# Altium PCB PCB1.PcbDoc (part 1 of 2)
Units mm, origin at the board's own origin, x right, y up, seen from the top; angles counter-clockwise.
Board outline 20 x 95 mm, 4 copper layers (Top Layer, Inner Layer 1, Inner Layer 2, Bottom Layer), stack 1.586 mm thick; 102 components, 66 nets, 399 pads, 49 vias.
Unrouted connection lines stored in the file: 134.
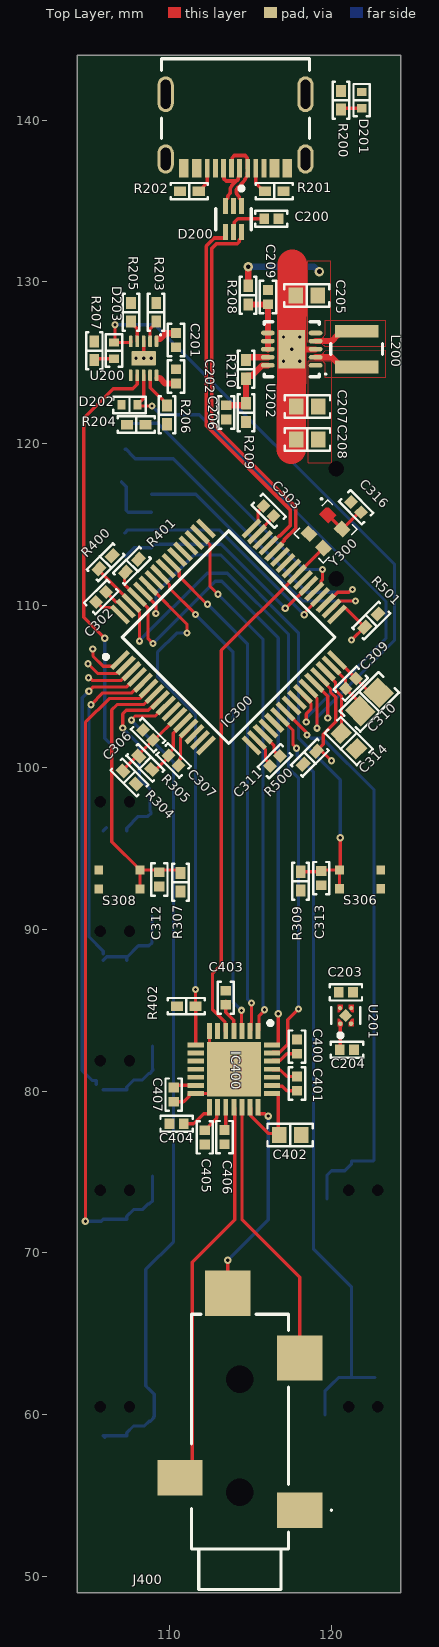
[diagram p0: Top Layer view]
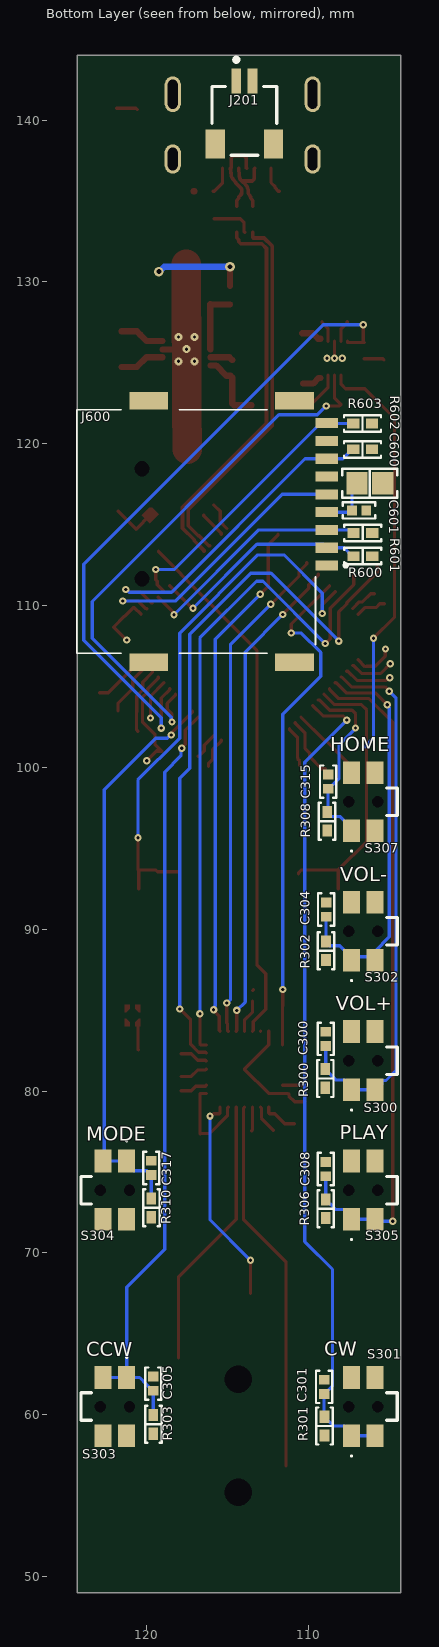
[diagram p1: Bottom Layer view, seen from below]
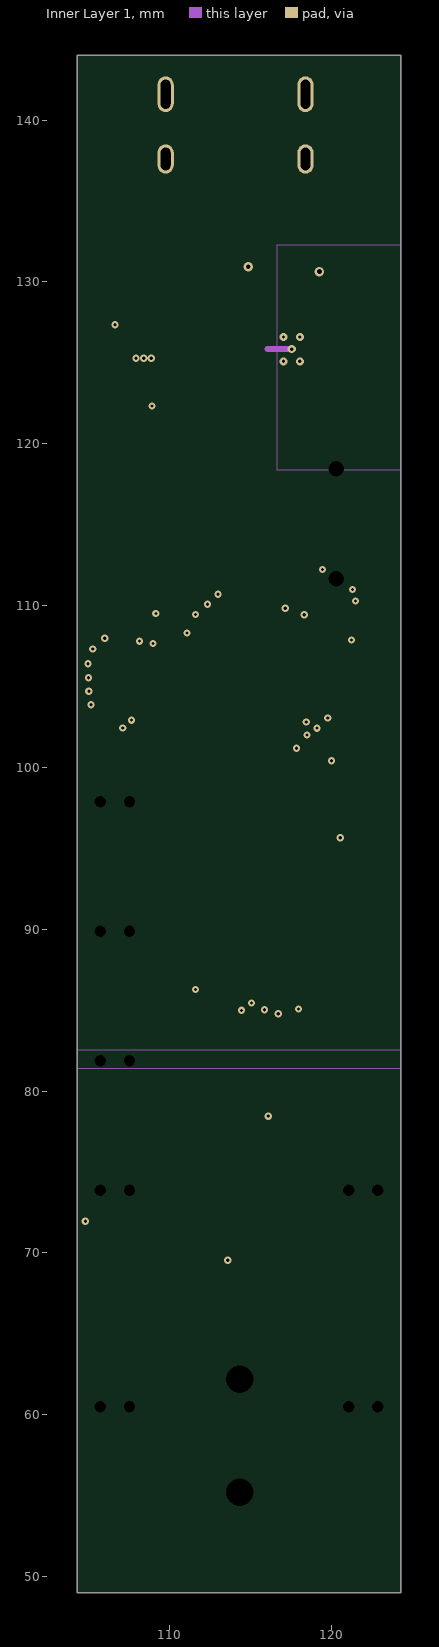
[diagram p2: Inner Layer 1]

## Layer stack, top to bottom
Top Solder: solder mask 0.0152, Solder Resist, Dk 3.8
Top Layer: signal copper 0.035
Dielectric 1: prepreg 0.2104, NP-155F, Dk 4.4
Inner Layer 1: signal copper 0.0152
Dielectric 2: core 1.065, NP-155F, Dk 4.43
Inner Layer 2: signal copper 0.0152
Dielectric 3: prepreg 0.2104, NP-155F, Dk 4.4
Bottom Layer: signal copper 0.035
Bottom Solder: solder mask 0.0152, Solder Resist, Dk 3.8

## Board outline
104.3,49 104.3,144 124.3,144 124.3,49

## Design rules (kind name [scope] priority, off if disabled: settings)
BoardOutlineClearance [All] p1: gap=0.2 ignorepadtopadclearanceinfootprint=FALSE
Clearance [All] p1: gap=0.102 ignorepadtopadclearanceinfootprint=FALSE except(0.127: Arc-Via Track-Via SMDPad-Via THPad-Via Via-Via Via-Fill Via-Poly Via-Region Via-Text; 0.25: Arc-Hole Track-Hole SMDPad-Hole THPad-Hole Via-Hole Fill-Hole Poly-Hole Region-Hole Text-Hole)
ComponentClearance [All] p1: gap=0.102 collisioncheckmode=3 verticalgap=0.102 showdistances=TRUE
DiffPairsRouting DiffPairsRoutingUSB_OUT [InDifferentialPair('USB_D')] p1: maxlimit=0.127 minlimit=0.127 mostfreqgap=0.127 toplayer_minwidth=0.224 toplayer_maxwidth=0.224 toplayer_prefwidth=0.224 midlayer1_minwidth=0.158 midlayer1_maxwidth=0.158 midlayer1_prefwidth=0.158 midlayer2_minwidth=0.158 midlayer2_maxwidth=0.158 midlayer2_prefwidth=0.158 bottomlayer_minwidth=0.225 bottomlayer_maxwidth=0.225 bottomlayer_prefwidth=0.225 impedanceprofiledriven=TRUE impedanceprofileid={13B3F718-4399-49E7-A551-6D1C1AD8C84B} impedanceprofilevalue=90.000000 maxuncoupledlength=12.7
DiffPairsRouting DiffPairsRoutingUSB_IN [InDifferentialPair('D_IN')] p2: maxlimit=0.127 minlimit=0.127 mostfreqgap=0.127 toplayer_minwidth=0.224 toplayer_maxwidth=0.224 toplayer_prefwidth=0.224 midlayer1_minwidth=0.158 midlayer1_maxwidth=0.158 midlayer1_prefwidth=0.158 midlayer2_minwidth=0.158 midlayer2_maxwidth=0.158 midlayer2_prefwidth=0.158 bottomlayer_minwidth=0.225 bottomlayer_maxwidth=0.225 bottomlayer_prefwidth=0.225 impedanceprofiledriven=TRUE impedanceprofileid={13B3F718-4399-49E7-A551-6D1C1AD8C84B} impedanceprofilevalue=90.000000 maxuncoupledlength=12.7
DiffPairsRouting [All] p3: maxlimit=0.102 minlimit=0.102 mostfreqgap=0.102 toplayer_minwidth=0.102 toplayer_maxwidth=1816.048 toplayer_prefwidth=0.102 midlayer1_minwidth=0.102 midlayer1_maxwidth=1816.048 midlayer1_prefwidth=0.102 midlayer2_minwidth=0.102 midlayer2_maxwidth=1816.048 midlayer2_prefwidth=0.102 bottomlayer_minwidth=0.102 bottomlayer_maxwidth=1816.048 bottomlayer_prefwidth=0.102 maxuncoupledlength=12.7
Height [All] p1: minheight=0 maxheight=1816.048 prefheight=12.7
HoleSize [All] p1: absolutevalues=TRUE maxlimit=6.3 minlimit=0.2 maxpercent=80.000 minpercent=20.000
HoleToHoleClearance [All] p1: gap=0.25 allowstackedmicrovias=FALSE
MinimumAnnularRing [All] p1: minimumring=0.076
MinimumSolderMaskSliver [All] p1: minsoldermaskwidth=0
PlaneClearance [All] p1: clearance=0.102
PlaneConnect PlaneConnectPowerPads [InNetClass('Power')] p1: planeconnectstyle=Direct reliefexpansion=0.508 reliefentries=4 reliefconductorwidth=0.254 reliefairgap=0.254
PlaneConnect [All] p2: pad.planeconnectstyle=Relief pad.reliefexpansion=0.3 pad.reliefentries=4 pad.reliefconductorwidth=0.102 pad.reliefairgap=0.102 via.planeconnectstyle=Direct via.reliefexpansion=0.3 via.reliefentries=4 via.reliefconductorwidth=0.127 via.reliefairgap=0.127
PolygonConnect PolygonConnectPowerPads [All vs InNetClass('Power')] p1: connectstyle=Direct reliefconductorwidth=0.254 reliefentries=4 polygonreliefangle="90 Angle" airgapwidth=0.254
PolygonConnect PolygonConnectGNDPads [All vs InNetClass('GND')] p2: connectstyle=Direct reliefconductorwidth=0.254 reliefentries=4 polygonreliefangle="90 Angle" airgapwidth=0.254
PolygonConnect [All] p3: thpad.connectstyle=Relief thpad.reliefconductorwidth=0.102 thpad.reliefentries=4 thpad.polygonreliefangle="90 Angle" thpad.airgapwidth=0.102 smdpad.connectstyle=Relief smdpad.reliefconductorwidth=0.102 smdpad.reliefentries=4 smdpad.polygonreliefangle="90 Angle" smdpad.airgapwidth=0.102 via.connectstyle=Direct via.reliefconductorwidth=0.127 via.reliefentries=4 via.polygonreliefangle="90 Angle" via.airgapwidth=0.127
RoutingVias [All] p1: holewidth=0.2 width=0.45 viastyle="Through Hole" minholewidth=0.2 minwidth=0.45 maxholewidth=6.3 maxwidth=6.55
ShortCircuit ShortCircuitGND [InNetClass('GND') vs InNetClass('GND')] p1: allowed=TRUE
ShortCircuit [All] p2: allowed=FALSE
SilkToSilkClearance [All] p1: silktosilkclearance=0
SilkToSolderMaskClearance [IsPad] p1: minsilkscreentomaskgap=0.102 clearancetoexposedcopper=TRUE
SolderMaskExpansion [All] p1: expansion=0.075 istentingtop=FALSE
SupplyNets "Schematic Supply Nets_7" [InNet('VBUS')] p1: voltage=0.000
SupplyNets "Schematic Supply Nets_6" [InNet('DGND')] p2: voltage=0.000
SupplyNets "Schematic Supply Nets_5" [InNet('PGND')] p3: voltage=0.000
SupplyNets "Schematic Supply Nets_4" [InNet('AGND')] p4: voltage=0.000
SupplyNets "Schematic Supply Nets_3" [InNet('AVDD_3V')] p5: voltage=0.000
SupplyNets "Schematic Supply Nets_2" [InNet('VBAT')] p6: voltage=0.000
SupplyNets "Schematic Supply Nets" [InNet('DVDD_3V3')] p7: voltage=0.000
Width [All] p1: maxlimit=1816.048 minlimit=0.102 preferedwidth=0.102
19 further rules are at their usual default settings.

## Classes and differential pairs
net class GND: AGND DGND PGND
net class Power: AVDD_3V DVDD_3V3 NetL200_1 NetL200_2 VBAT VBUS
component class Power: C200 C201 C202 C203 C204 C205 C206 C207 C208 C209 D200 D201 D202 D203 J201 L200 NT200 R200 R201 R202 R203 R204 R205 R206 R207 R208 R209 R210 U200 U201 U202
component class Memory: C600 C601 J600 R600 R601 R602 R603
component class MCU: C300 C301 C302 C303 C304 C305 C306 C307 C308 C309 C310 C311 C312 C313 C314 C315 C316 C317 IC300 R300 R301 R302 R303 R304 R305 R306 R307 R308 R309 R310 S300 S301 S302 S303 S304 S305 S306 S307 S308 Y300
component class Display: C500 C501 C502 C503 C504 C505 J500 R500 R501 R502
component class Audio: C400 C401 C402 C403 C404 C405 C406 C407 IC400 J400 NT400 R400 R401 R402
differential pair USB_D: +USB_D_P -USB_D_N
differential pair D_IN: +D_IN_P -D_IN_N

## Components (designator, comment, footprint, x,y, rotation, side; value= is the part's Value field where it differs from the comment)
C200 "0.1 µF" "CAP 0402_1005" 116.287,133.902 r0 top
C201 "1 µF" "CAP 0402_1005" 110.4,126.4 r90 top
C202 "1 µF" "CAP 0402_1005" 110.4,124.16 r270 top
C203 "1 µF" "CAP 0402_1005" 120.892,86.096 r180 top
C204 "1 µF" "CAP 0402_1005" 120.96,82.55 r180 top
C205 "10 µF" "CAP 0603_1608" 118.477,129.15 r0 top
C206 "2.2 pF" "CAP 0402_1005" 113.508,121.932 r90 top
C207 "10 µF" "CAP 0603_1608" 118.517,122.292 r0 top
C208 "10 µF" "CAP 0603_1608" 118.517,120.26 r0 top
C209 "0.1 µF" "CAP 0402_1005" 116.085,129.055 r270 top
C300 "0.1 µF" "CAP 0402_1005" 108.95,83.225 r90 bottom
C301 "0.1 µF" "CAP 0402_1005" 109.05,61.725 r90 bottom
C302 "0.1 µF" "CAP 0402_1005" 105.775,110.525 r225 top
C303 "0.1 µF" "CAP 0402_1005" 116.125,115.85 r315 top
C304 "0.1 µF" "CAP 0402_1005" 108.925,91.215 r90 bottom
C305 "0.1 µF" "CAP 0402_1005" 119.6,61.915 r90 bottom
C306 "0.1 µF" "CAP 0402_1005" 108.675,102 r315 top
C307 "0.1 µF" "CAP 0402_1005" 110.25,100.425 r135 top
C308 "0.1 µF" "CAP 0402_1005" 108.95,75.175 r90 bottom
C309 "0.1 µF" "CAP 0402_1005" 121.2,105.175 r225 top
C310 "4.7 µF" "CAP 0805_2012" 122.35,104.05 r45 top
C311 "0.1 µF" "CAP 0402_1005" 116.51,100.382 r45 top
C312 "0.1 µF" "CAP 0402_1005" 109.375,93.075 r270 top
C313 "0.1 µF" "CAP 0402_1005" 119.375,93.15 r270 top
C314 "2.2 µF" "CAP 0603_1608" 121.075,101.625 r135 top
C315 "0.1 µF" "CAP 0402_1005" 108.8,99.115 r90 bottom
C316 "0.1 µF" "CAP 0402_1005" 121.525,116.075 r135 top
C317 "0.1 µF" "CAP 0402_1005" 119.725,75.25 r90 bottom
C400 "1 µF" "CAP 0402_1005" 117.875,82.74 r90 top
C401 "0.47 µF" "CAP 0402_1005" 117.875,80.46 r270 top
C402 "2.2 µF" "CAP 0603_1608" 117.456,77.284 r0 top
C403 "1 µF" "CAP 0402_1005" 113.475,85.765 r90 top
C404 "1 µF" "CAP 0402_1005" 110.44,77.975 r180 top
C405 "1 µF" "CAP 0402_1005" 112.175,77.14 r270 top
C406 "1 µF" "CAP 0402_1005" 113.4,77.15 r270 top
C407 "1 µF" "CAP 0402_1005" 110.25,79.775 r270 top
C500 "1 µF" "CAP 0603_1608" 139.625,68.25 r90 bottom
C501 "1 µF" "CAP 0603_1608" 134.5,68.275 r90 bottom
C502 "1 µF" "CAP 0603_1608" 137.9,68.25 r270 bottom
C503 "1 µF" "CAP 0603_1608" 136.175,68.25 r90 bottom
C504 "4.7 µF" "CAP 0805_2012" 131.3,68.575 r270 bottom
C505 "2.2 µF" "CAP 0603_1608" 129.4,68.3 r90 bottom
C600 "4.7 µF" "CAP 0805_2012" 106.225,117.55 r0 bottom
C601 "0.1 µF" "CAP 0402_1005" 106.89,115.875 r180 bottom
D200 "USBLC6-2P6" FP-SOT-666-MFG 113.952,133.872 r270 top
D201 "Green" "LED QTB IPC 0402_1005 GREEN" 121.875,141.225 r270 top
D202 "Blue" "LED QTB IPC 0402_1005 BLUE" 107.525,122.4 r180 top
D203 "Red" "LED QTB IPC 0402_1005 RED" 106.575,125.75 r270 top
IC300 "STM32C552RET6" QFP50P1200X1200X160-64N 113.65,108.05 r45 top locked
IC400 "MAX9850ETI+T" QFN50P500X500X80-29N 113.975,81.35 r270 top
J201 "SM02B-SRSS-TB (LF)(SN)" FP-SM02B-SRSS-TB_LF_SN-MFG 113.975,139.95 r180 bottom
J400 "SJ-3524-SMT-TR-BE" SJ3524SMTTRBE 114.35,58.95 r90 top locked
J500 "FPC-CON0.62-14P" FPC-CON0.62-14P 138.395,64.1 r90 bottom
J600 "MEM2075-00-140-01-A" MEM20750014001A 116.255,114.575 r270 bottom
L200 "1.5 uH" FP-LQH3NPN_JR-MFG 121.565,125.848 r270 top
NT200 "NET_TIE" NET_TIE 148.65,140.544 r180 top net-tie
NT400 "NET_TIE" NET_TIE 148.25,135 r180 top net-tie
R200 "1.5 kOhms" "RES 0402_1005" 120.6,141.225 r270 top
R201 "5.1 kOhms" "RES 0402_1005" 116.477,135.602 r180 top
R202 "5.1 kOhms" "RES 0402_1005" 111.227,135.602 r0 top
R203 "1.54 kOhms" "RES 0402_1005" 109.175,128.125 r270 top
R204 "1.5 kOhms" "RES 0402_1005" 107.95,121.175 r180 top
R205 "2 kOhms" "RES 0402_1005" 107.625,128.125 r270 top
R206 "10 kOhms" "RES 0402_1005" 109.85,121.775 r90 top
R207 "1.5 kOhms" "RES 0402_1005" 105.35,125.75 r270 top
R208 "100 Ohms" "RES 0402_1005" 114.86,129.18 r90 top
R209 "1 MOhms" "RES 0402_1005" 114.724,121.924 r270 top
R210 "178 kOhms" "RES 0402_1005" 114.724,124.591 r270 top
R300 "10 kOhms" "RES 0402_1005" 108.975,80.775 r270 bottom
R301 "10 kOhms" "RES 0402_1005" 109.025,59.3 r270 bottom
R302 "10 kOhms" "RES 0402_1005" 108.925,88.675 r270 bottom
R303 "10 kOhms" "RES 0402_1005" 119.6,59.4 r270 bottom
R304 "100 kOhms" "RES 0402_1005" 107.525,99.375 r315 top
R305 "100 kOhms" "RES 0402_1005" 108.5,100.275 r135 top
R306 "10 kOhms" "RES 0402_1005" 108.95,72.725 r270 bottom
R307 "10 kOhms" "RES 0402_1005" 110.675,92.9 r270 top
R308 "10 kOhms" "RES 0402_1005" 108.858,96.669 r270 bottom
R309 "10 kOhms" "RES 0402_1005" 118.1,92.975 r90 top
R310 "10 kOhms" "RES 0402_1005" 119.725,72.775 r270 bottom
R400 "10 kOhms" "RES 0402_1005" 106.05,112.675 r225 top
R401 "10 kOhms" "RES 0402_1005" 107.682,112.457 r45 top
R402 "10 kOhms" "RES 0402_1005" 111.038,85.241 r180 top
R500 "10 kOhms" "RES 0402_1005" 118.668,100.593 r45 top
R501 "10 kOhms" "RES 0402_1005" 122.468,109.068 r225 top
R502 "390 kOhms" "RES 0402_1005" 133.025,68.05 r270 bottom
R600 "10 kOhms" "RES 0402_1005" 106.65,113.05 r180 bottom
R601 "10 kOhms" "RES 0402_1005" 106.65,114.475 r180 bottom
R602 "10 kOhms" "RES 0402_1005" 106.675,119.65 r180 bottom
R603 "100 kOhms" "RES 0402_1005" 106.675,121.25 r180 bottom
S300 "EVQP7L01P" EVQP7L01P 106.3,81.875 r90 bottom
S301 "EVQP7L01P" EVQP7L01P 106.3,60.5 r90 bottom
S302 "EVQP7L01P" EVQP7L01P 106.3,89.875 r90 bottom locked
S303 "EVQP7L01P" EVQP7L01P 122.3,60.5 r270 bottom locked
S304 "EVQP7L01P" EVQP7L01P 122.3,73.875 r270 bottom locked
S305 "EVQP7L01P" EVQP7L01P 106.3,73.875 r90 bottom
S306 "SKSVCBE010" SKSVCBE010 121.775,93.075 r0 top
S307 "EVQP7L01P" EVQP7L01P 106.3,97.875 r90 bottom
S308 "SKSVCBE010" SKSVCBE010 106.9,93.07 r0 top
U200 "BQ24040DSQR" DSQ0010A_V 108.4,125.275 r270 top
U201 "TPS7A2030PDQNR" DQN0004A-MFG 120.885,84.665 r90 top
U202 "TPS63000DRCRG4" DRC10-2400X1650TP 117.55,125.84 r180 top
Y300 "DSC6001JI2B-022.5792T" 4-VLGA-2.5X2 120.667,114.717 r225 top

## Footprints (in the part's own frame and the unit in brackets; to place one, negate y for a bottom-side part, rotate by r counter-clockwise, add the part's x,y. Pads: shape width x height; smd on the part's side, far side on the other; paste and mask are expansions set on the pad)
4-VLGA-2.5X2 [mm]
  round 0.025 smd: 1(0,-1.25)
  rect 0.7x0.8 smd: 2(1.65,-1.25) 3(1.65,0) 4(0,0)
  silkscreen extent -0.65,-2.24 2.3,0.65
"CAP 0402_1005" [mm] "Chip Capacitor, 2-Leads, Body 1.02x0.51mm, IPC Medium Density"
  rect 0.6x0.64 smd: 1(-0.44,0) 2(0.44,0)
  silkscreen extent -1,-0.5 1,0.5, body extent -0.5,-0.26 0.5,0.26, height 0.52
"CAP 0603_1608" [mm] "Chip Capacitor, 2-Leads, Body 1.60x0.80mm, IPC Medium Density"
  rect 0.9x1 smd: 1(-0.675,0) 2(0.675,0)
  silkscreen extent -1.4,-0.7 1.4,0.7, body extent -0.8,-0.41 0.8,0.41, height 0.82
"CAP 0805_2012" [mm] "Chip Capacitor, 2-Leads, Body 2.00x1.20mm, IPC Medium Density"
  rect 1.3x1.4 smd: 1(-0.8,0) 2(0.8,0)
  silkscreen extent -1.7,-0.9 1.7,0.9, body extent -1,-0.64 1,0.64, height 1.26
DQN0004A-MFG [mm]
  round 0.279 smd paste-0.127 mask-0.127: 1(-0.505,0.33) 2(-0.505,-0.33)
  round 0.251 smd paste-0.113 mask-0.114: 3(0.459,-0.346) 4(0.459,0.346)
  rect 0.58x0.58 smd rot 135 paste-0.277 mask-0.279: 5(0,0)
  Top Layer region: 0.66,-0.175 0.66,-0.485 0.2,-0.485 0.2,-0.385 0.41,-0.175
  Top Layer region: 0.66,0.175 0.66,0.485 0.2,0.485 0.2,0.385 0.41,0.175
  Top Layer region: -0.66,-0.175 -0.66,-0.485 -0.2,-0.485 -0.2,-0.385 -0.41,-0.175
  Top Layer region: -0.66,0.175 -0.66,0.485 -0.2,0.485 -0.2,0.385 -0.41,0.175
  silkscreen extent -1.35,-0.9 0.53,0.9, body extent -0.5,-0.5 0.5,0.5, height 0.34
DRC10-2400X1650TP [mm] "SON, 10-Leads, Body 3x3mm, Pitch 0.5mm, Thermal Pad 2.4x1.65mm, TI Recommended"
  oval 0.85x0.28 smd paste-0.025 mask+0.07: 1(-1.475,1) 2(-1.475,0.5) 3(-1.475,0) 4(-1.475,-0.5) 5(-1.475,-1) 6(1.475,-1) 7(1.475,-0.5) 8(1.475,0) 9(1.475,0.5) 10(1.475,1)
  rect 1.65x2.4 smd paste-0.825 mask+0.07: 11(0,0)
  Top Layer region: -0.39,-1.9 -0.11,-1.9 -0.11,-1.2 -0.39,-1.2
  Top Layer region: 0.39,-1.2 0.11,-1.2 0.11,-1.9 0.39,-1.9
  Top Layer region: 0.39,1.9 0.11,1.9 0.11,1.2 0.39,1.2
  Top Layer region: -0.39,1.2 -0.11,1.2 -0.11,1.9 -0.39,1.9
  silkscreen extent -2.15,-1.7 1.7,1.7, body extent -1.55,-1.55 1.55,1.55, height 1
DSQ0010A_V [mm] "SON, 10-Leads, Body 2x2mm, Pitch 0.4mm, Thermal Pad 1.5x0.9mm"
  rrect43% 0.7x0.23 smd: 1(-1.05,0.8) 2(-1.05,0.4) 3(-1.05,0) 4(-1.05,-0.4) 5(-1.05,-0.8) 6(1.05,-0.8) 7(1.05,-0.4) 8(1.05,0) 9(1.05,0.4) 10(1.05,0.8)
  rrect11% 0.9x1.5 smd: 11(0,0)
  silkscreen extent -1.5,1 -1.4,1.1, body extent -1,-1 1,1, height 0.8
EVQP7L01P [mm]
  rect 1.4x1.05 smd: 1(-1.8,1.05) 2(1.8,1.05) 3(-1.8,-0.4) 4(1.8,-0.4)
  round 0.35 hole 0.7 unplated: 5(0,1.225) 6(0,-0.575)
  silkscreen extent -3.1,-1.78 0.85,1.1, body extent -2.35,-1.78 2.35,1.77, height 1.35
FP-LQH3NPN_JR-MFG [mm]
  rect 0.8x2.7 smd paste+0 mask+0: 1(-1.1,0) 2(1.1,0)
  silkscreen extent -0.33,-1.6 0.33,1.6, body extent -1.7,-1.7 1.7,1.7, height 0.25
FP-SM02B-SRSS-TB_LF_SN-MFG [mm]
  rect 0.6x1.55 smd paste+0 mask+0: 1(-0.5,2.45) 2(0.5,2.45)
  rect 1.2x1.8 smd paste+0 mask+0: 3(-1.8,-1.425) 4(1.8,-1.425)
  silkscreen extent -2,-2.12 2,3.9, body extent -2,-2.12 2,2.83, height 2.96
FP-SOT-666-MFG [mm]
  rect 0.99x0.3 smd paste+0 mask+0: 1(-0.805,0.5) 2(-0.805,0) 3(-0.805,-0.5) 4(0.805,-0.5) 5(0.805,0) 6(0.805,0.5)
  silkscreen extent -2.02,-1.1 0.65,1.1, body extent -1.4,-0.95 1.4,0.95, height 0.25
FPC-CON0.62-14P [mm] "FPC Connector 14 Pin 0.62mm Pitch"
  rect 2.5x0.32 smd: 1(0.25,0) 2(0.25,-0.62) 3(0.25,-1.24) 4(0.25,-1.86) 5(0.25,-2.48) 6(0.25,-3.1) 7(0.25,-3.72) 8(0.25,-4.34) 9(0.25,-4.96) 10(0.25,-5.58) 11(0.25,-6.2) 12(0.25,-6.82) 13(0.25,-7.44) 14(0.25,-8.06)
  silkscreen extent -5.4,-8.65 1.04,0.6
"LED QTB IPC 0402_1005 BLUE" [mm] "QT BrightekChip Diode, 2-Leads, Body 1.00x0.50mm"
  rect 0.5x0.6 smd: A(0.5,0) C(-0.5,0)
  silkscreen extent -1,-0.51 1,0.51, body extent -0.5,-0.25 0.5,0.25, height 0.21
"LED QTB IPC 0402_1005 GREEN" [mm] "QT BrightekChip Diode, 2-Leads, Body 1.00x0.50mm"
  rect 0.5x0.6 smd: A(0.5,0) C(-0.5,0)
  silkscreen extent -1,-0.51 1,0.51, body extent -0.5,-0.25 0.5,0.25, height 0.21
"LED QTB IPC 0402_1005 RED" [mm] "QT BrightekChip Diode, 2-Leads, Body 1.00x0.50mm"
  rect 0.5x0.6 smd: A(0.5,0) C(-0.5,0)
  silkscreen extent -1,-0.51 1,0.51, body extent -0.5,-0.25 0.5,0.25, height 0.21
MEM20750014001A [mm]
  rect 0.62x1.4 smd: 1(2.105,7.375) 2(1.005,7.375) 3(-0.095,7.375) 4(-1.195,7.375) 5(-2.295,7.375) 6(-3.395,7.375) 7(-4.495,7.375) 8(-5.595,7.375) 9(-6.695,7.375)
  rect 1.1x2.4 smd: 10(-8.075,5.375) 11(-8.075,-3.625) 12(8.075,-3.625) 13(8.075,5.375)
  round 0.475 hole 0.95 unplated: 14(-3.875,-4.045) 15(2.925,-4.045)
  silkscreen extent -7.52,-8.08 7.52,8.65, body extent -8.23,-8.24 8.22,7.61, height 1.39
NET_TIE [mil] "Net Tie"
  rect 60x60 smd: 1(0,-0.98) 2(125.98,-0.98)
  Top Layer region: 15.75,-30.99 112.6,-30.99 112.6,29.01 15.75,29.01
QFN50P500X500X80-29N [mm]
  rect 1x0.3 smd: 1(-2.35,1.5) 2(-2.35,1) 3(-2.35,0.5) 4(-2.35,0) 5(-2.35,-0.5) 6(-2.35,-1) 7(-2.35,-1.5) 15(2.35,-1.5) 16(2.35,-1) 17(2.35,-0.5) 18(2.35,0) 19(2.35,0.5) 20(2.35,1) 21(2.35,1.5)
  rect 0.3x1 smd: 8(-1.5,-2.35) 9(-1,-2.35) 10(-0.5,-2.35) 11(0,-2.35) 12(0.5,-2.35) 13(1,-2.35) 14(1.5,-2.35) 22(1.5,2.35) 23(1,2.35) 24(0.5,2.35) 25(0,2.35) 26(-0.5,2.35) 27(-1,2.35) 28(-1.5,2.35)
  rect 3.35x3.35 smd: 29(0,0)
  silkscreen extent -2.97,2.13 -2.73,2.38, body extent -2.55,-2.55 2.55,2.55, height 0.8
QFP50P1200X1200X160-64N [mm]
  rect 1.475x0.3 smd: 1(-5.738,3.75) 2(-5.738,3.25) 3(-5.738,2.75) 4(-5.738,2.25) 5(-5.738,1.75) 6(-5.738,1.25) 7(-5.738,0.75) 8(-5.738,0.25) 9(-5.738,-0.25) 10(-5.738,-0.75) 11(-5.738,-1.25) 12(-5.738,-1.75) 13(-5.738,-2.25) 14(-5.738,-2.75) 15(-5.738,-3.25) 16(-5.738,-3.75) 33(5.738,-3.75) 34(5.738,-3.25) 35(5.738,-2.75) 36(5.738,-2.25) 37(5.738,-1.75) 38(5.738,-1.25) 39(5.738,-0.75) 40(5.738,-0.25) 41(5.738,0.25) 42(5.738,0.75) 43(5.738,1.25) 44(5.738,1.75) 45(5.738,2.25) 46(5.738,2.75) 47(5.738,3.25) 48(5.738,3.75)
  rect 0.3x1.475 smd: 17(-3.75,-5.738) 18(-3.25,-5.738) 19(-2.75,-5.738) 20(-2.25,-5.738) 21(-1.75,-5.738) 22(-1.25,-5.738) 23(-0.75,-5.738) 24(-0.25,-5.738) 25(0.25,-5.738) 26(0.75,-5.738) 27(1.25,-5.738) 28(1.75,-5.738) 29(2.25,-5.738) 30(2.75,-5.738) 31(3.25,-5.738) 32(3.75,-5.738) 49(3.75,5.738) 50(3.25,5.738) 51(2.75,5.738) 52(2.25,5.738) 53(1.75,5.738) 54(1.25,5.738) 55(0.75,5.738) 56(0.25,5.738) 57(-0.25,5.738) 58(-0.75,5.738) 59(-1.25,5.738) 60(-1.75,5.738) 61(-2.25,5.738) 62(-2.75,5.738) 63(-3.25,5.738) 64(-3.75,5.738)
  silkscreen extent -6.35,-4.65 4.65,4.65, body extent -6.01,-6.01 6.01,6.01, height 1.61
"RES 0402_1005" [mm] "Chip Resistor, 2-Leads, Body 1.0x0.5mm, IPC Medium Density"
  rect 0.75x0.6 smd: 1(-0.575,0) 2(0.575,0)
  silkscreen extent -1.14,-0.51 1.14,0.51, body extent -0.5,-0.25 0.5,0.25, height 0.35
SJ3524SMTTRBE [mm]
  rect 2.2x2.8 smd: 1(-4.85,-3.7) 3(-2.85,3.7)
  rect 2.8x2.8 smd: 2(4.55,-3.7) 4(8.55,0.75)
  round 0.85 hole 1.7 unplated: MH1(-3.75,0) MH2(3.25,0)
  silkscreen extent -9.75,-5.7 7.25,3, body extent -9.75,-4.5 9.25,4.5, height 5.1
SKSVCBE010 [mm]
  rect 0.55x0.57 smd: 1(-1.275,0.58) 2(-1.275,-0.58) 3(1.275,0.58) 4(1.275,-0.58)
  body extent -1.5,-0.95 1.5,0.95, height 0.51

## Part data
C200 C209 C300 C301 C302 C303 C304 C305 C306 C307 C308 C309 C311 C312 C313 C315 C316 C317 C601: library part EMF105B7104KVHF, "CAP CER 0.1UF 16V X7R 0402", Device Package="0402 (1005 Metric)", manufacturer="Taiyo Yuden", Operating Temperature="-55°C ~ 125°C", Ratings=AEC-Q200, Supplier Part Number 1=587-6563-1-ND, Temperature Coefficient=X7R, Tolerance=±10%, Voltage - Rated=16V, Applications="Automotive, SMPS Filtering", Capacitance="0.1 µF", componentlink1description=Datasheet, componentlink1url=https://ds.yuden.co.jp/TYCOMPAS/ut/detail?pn=EMF105B7104KVHF&u=M, componentlink2description="DigiKey Link", componentlink2url=https://www.digikey.com/en/products/detail/taiyo-yuden/EMF105B7104KVHF/10379129, lastupdated="4/6/2026 7:11:11 PM", Lifecycle Status=Active, Minimum Order=1, Mounting Type="Surface Mount, MLCC", Package / Case="0402 (1005 Metric)", packaging=TapeAndReel, Part Number=EMF105B7104KVHF, Part Status=Active, partid=1868, price=0.01, series=M, Size / Dimension="0.039\" L x 0.020\" W (1.00mm x 0.50mm)", Supplier 1=DigiKey, Thickness (Max)="0.022\" (0.55mm)"
C201 C202 C203 C204 C400 C403 C404 C405 C406 C407: library part GRM155R61C105MA12D, "CAP CER 1UF 16V X5R 0402", Device Package="0402 (1005 Metric)", manufacturer="Murata Electronics", Operating Temperature="-55°C ~ 85°C", Supplier Part Number 1=490-14599-1-ND, Temperature Coefficient=X5R, Tolerance=±20%, Voltage - Rated=16V, Applications="General Purpose", Capacitance="1 µF", componentlink1description=Datasheet, componentlink1url=https://search.murata.co.jp/Ceramy/image/img/A01X/G101/ENG/GRM155R61C105MA12-01.pdf, componentlink2description="DigiKey Link", componentlink2url=https://www.digikey.com/en/products/detail/murata-electronics/GRM155R61C105MA12D/4905131, lastupdated="4/6/2026 7:10:35 PM", Lifecycle Status=Active, Minimum Order=1, Mounting Type="Surface Mount, MLCC", Package / Case="0402 (1005 Metric)", packaging=TapeAndReel, Part Number=GRM155R61C105MA12D, Part Status=Active, partid=10295, price=0.01, series=GRM, Size / Dimension="0.039\" L x 0.020\" W (1.00mm x 0.50mm)", Supplier 1=DigiKey, Thickness (Max)="0.022\" (0.55mm)"
C205 C207 C208: library part GRM188R61A106ME69D, "CAP CER 10UF 10V X5R 0603", Device Package="0603 (1608 Metric)", manufacturer="Murata Electronics", Operating Temperature="-55°C ~ 85°C", Supplier Part Number 1=490-10475-1-ND, Temperature Coefficient=X5R, Tolerance=±20%, Voltage - Rated=10V, Applications="General Purpose", Capacitance="10 µF", componentlink1description=Datasheet, componentlink1url=https://search.murata.co.jp/Ceramy/image/img/A01X/G101/ENG/GRM188R61A106ME69-01.pdf, componentlink2description="DigiKey Link", componentlink2url=https://www.digikey.com/en/products/detail/murata-electronics/GRM188R61A106ME69D/5027560, lastupdated="4/6/2026 7:23:20 PM", Lifecycle Status=Active, Minimum Order=1, Mounting Type="Surface Mount, MLCC", Package / Case="0603 (1608 Metric)", packaging=TapeAndReel, Part Number=GRM188R61A106ME69D, Part Status=Active, partid=11157, price=0.01, series=GRM, Size / Dimension="0.063\" L x 0.031\" W (1.60mm x 0.80mm)", Supplier 1=DigiKey, Thickness (Max)="0.037\" (0.95mm)"
C206: library part UMK105CG2R2CV-F, "CAP CER 2.2PF 50V C0G/NP0 0402", Device Package="0402 (1005 Metric)", manufacturer="Taiyo Yuden", Operating Temperature="-55°C ~ 125°C", Supplier Part Number 1=587-3179-1-ND, Temperature Coefficient="C0G, NP0", Tolerance=±0.25pF, Voltage - Rated=50V, Applications="General Purpose", Capacitance="2.2 pF", componentlink2description="DigiKey Link", componentlink2url=https://www.digikey.com/en/products/detail/taiyo-yuden/UMK105CG2R2CV-F/3194992, lastupdated="06/04/2026 19:11:11", Lifecycle Status=Active, Minimum Order=1, Mounting Type="Surface Mount, MLCC", Package / Case="0402 (1005 Metric)", packaging=TapeAndReel, Part Number=UMK105CG2R2CV-F, Part Status=Active, partid=1907, price=0.01, series=M, Size / Dimension="0.039\" L x 0.020\" W (1.00mm x 0.50mm)", Supplier 1=DigiKey, Thickness (Max)="0.022\" (0.55mm)"
C310 C504 C600: library part MSAST21GAB5475KTNA01, "CAP CER 4.7UF 25V X5R 0805", Device Package="0805 (2012 Metric)", manufacturer="Taiyo Yuden", Operating Temperature="-55°C ~ 85°C", Supplier Part Number 1=587-MSAST21GAB5475KTNA01CT-ND, Temperature Coefficient=X5R, Tolerance=±10%, Voltage - Rated=25V, Applications="SMPS Filtering", Capacitance="4.7 µF", componentlink1description=Datasheet, componentlink1url=https://mm.digikey.com/Volume0/opasdata/d220001/medias/docus/5731/MSR01_e.pdf, componentlink2description="DigiKey Link", componentlink2url=https://www.digikey.com/en/products/detail/taiyo-yuden/MSAST21GAB5475KTNA01/16659772, lastupdated="4/6/2026 7:29:35 PM", Lifecycle Status=Active, Minimum Order=1, Mounting Type="Surface Mount, MLCC", Package / Case="0805 (2012 Metric)", packaging=TapeAndReel, Part Number=MSAST21GAB5475KTNA01, partid=73602, price=0.02, series=MSAS, Size / Dimension="0.079\" L x 0.049\" W (2.00mm x 1.25mm)", Supplier 1=DigiKey, Thickness (Max)="0.055\" (1.40mm)"
C314 C402 C505: library part GRM188R61E225KA12D, "CAP CER 2.2UF 25V X5R 0603", Device Package="0603 (1608 Metric)", manufacturer="Murata Electronics", Operating Temperature="-55°C ~ 85°C", Supplier Part Number 1=490-10731-1-ND, Temperature Coefficient=X5R, Tolerance=±10%, Voltage - Rated=25V, Applications="General Purpose", Capacitance="2.2 µF", componentlink1description=Datasheet, componentlink1url=https://search.murata.co.jp/Ceramy/image/img/A01X/G101/ENG/GRM188R61E225KA12-01.pdf, componentlink2description="DigiKey Link", componentlink2url=https://www.digikey.com/en/products/detail/murata-electronics/GRM188R61E225KA12D/4905349, lastupdated="4/6/2026 7:23:52 PM", Lifecycle Status=Active, Minimum Order=1, Mounting Type="Surface Mount, MLCC", Package / Case="0603 (1608 Metric)", packaging=TapeAndReel, Part Number=GRM188R61E225KA12D, Part Status=Active, partid=2326, price=0.01, series=GRM, Size / Dimension="0.063\" L x 0.031\" W (1.60mm x 0.80mm)", Supplier 1=DigiKey, Thickness (Max)="0.035\" (0.90mm)"
C401: library part CL05A474KP5NNNC, "CAP CER 0.47UF 10V X5R 0402", Device Package="0402 (1005 Metric)", manufacturer="Samsung Electro-Mechanics", Operating Temperature="-55°C ~ 85°C", Supplier Part Number 1=1276-1173-1-ND, Temperature Coefficient=X5R, Tolerance=±10%, Voltage - Rated=10V, Applications="General Purpose", Capacitance="0.47 µF", componentlink1description=Datasheet, componentlink1url=http://www.samsungsem.com/kr/support/product-search/mlcc/CL05A474KP5NNNC.jsp, componentlink2description="DigiKey Link", componentlink2url=https://www.digikey.com/en/products/detail/samsung-electro-mechanics/CL05A474KP5NNNC/3886831, lastupdated="4/6/2026 7:11:04 PM", Lifecycle Status=Active, Minimum Order=1, Mounting Type="Surface Mount, MLCC", Package / Case="0402 (1005 Metric)", packaging=TapeAndReel, Part Number=CL05A474KP5NNNC, Part Status=Active, partid=3144, price=0.01, series=CL, Size / Dimension="0.039\" L x 0.020\" W (1.00mm x 0.50mm)", Supplier 1=DigiKey, Thickness (Max)="0.022\" (0.55mm)"
C500 C501 C502 C503: library part CL10A105KA8NFNC, "CAP CER 1UF 25V X5R 0603", Device Package="0603 (1608 Metric)", manufacturer="Samsung Electro-Mechanics", Operating Temperature="-55°C ~ 85°C", Supplier Part Number 1=1276-1859-1-ND, Temperature Coefficient=X5R, Tolerance=±10%, Voltage - Rated=25V, Applications="General Purpose", Capacitance="1 µF", componentlink1description=Datasheet, componentlink1url=http://www.samsungsem.com/kr/support/product-search/mlcc/CL10A105KA8NFNC.jsp, componentlink2description="DigiKey Link", componentlink2url=https://www.digikey.com/en/products/detail/samsung-electro-mechanics/CL10A105KA8NFNC/3887517, lastupdated="4/6/2026 7:23:08 PM", Lifecycle Status=Active, Minimum Order=1, Mounting Type="Surface Mount, MLCC", Package / Case="0603 (1608 Metric)", packaging=TapeAndReel, Part Number=CL10A105KA8NFNC, Part Status=Active, partid=14268, price=0.01, series=CL, Size / Dimension="0.063\" L x 0.031\" W (1.60mm x 0.80mm)", Supplier 1=DigiKey, Thickness (Max)="0.035\" (0.90mm)"
D200: library part CMP-12225-000058-1, "TVS DIODE 5.25V 17V SOT666", Breakdown Voltage=6V, Capacitance=3.5pF, Case/Package=SOT-666, Clamping Voltage=17V, Leakage Current=150nA, Max Operating Temperature=125°C, Min Operating Temperature=-40°C, Operating Supply Voltage=5V, Package Quantity=1, Peak Pulse Current=5A, Power Line Protection=Yes, Test Current=1mA, Contact Plating=Tin, Depth=1.3mm, Direction=Unidirectional, Element Configuration=Dual, ESD Protection=Yes, Height=0.6mm, Lead Free="Lead Free", Length=1.7mm, Max Breakdown Voltage=6V, Max Reverse Leakage Current=150nA, Min Breakdown Voltage=6V, Mount="Surface Mount", Number of Bidirectional Channels=2, Number of Channels=2, Number of Elements=1, Number of Pins=6, packaging="Tape and Reel", Polarity=Unidirectional, Radiation Hardening=No, REACH SVHC="No SVHC", Reverse Breakdown Voltage=6V, Reverse Standoff Voltage=5V, Termination=SMD/SMT, Width=1.3mm, Working Voltage=5V
D201: library part QBLP595-IG, "LED GREEN CLEAR 0402 SMD", Current - Test=20mA, Device Package="0402 (1005 Metric)", Lens Color=Colorless, manufacturer="QT Brightek (QTB)", Millicandela Rating=600mcd, Supplier Device Package=0402, Supplier Part Number 1=1516-1216-1-ND, Voltage - Forward (Vf) (Typ)=3.1V, Color=Green, componentlink1description=Datasheet, componentlink1url="http://www.qt-brightek.com/datasheet/QBLP595 Series.pdf", componentlink2description="DigiKey Link", componentlink2url=https://www.digikey.com/en/products/detail/qt-brightek-qtb/QBLP595-IG/6201907, Configuration=Standard, Height (Max)=0.60mm, lastupdated="4/5/2026 9:26:25 PM", Lens Size="0.70mm x 0.50mm", Lens Style="Rectangle with Flat Top", Lens Transparency=Clear, Lifecycle Status=Active, Minimum Order=1, Mounting Type="Surface Mount", Package / Case="0402 (1005 Metric)", packaging=TapeAndReel, Part Number=QBLP595-IG, Part Status=Active, partid=717, price=0.07, series=QBLP595, Size / Dimension="1.00mm L x 0.50mm W", Supplier 1=DigiKey, Viewing Angle=140°, Wavelength - Dominant=520nm, Wavelength - Peak=515nm
D202: library part QBLP595-2IB, "0402 LED BLUE 465NM, CLEAR LENS,", Current - Test=20mA, Device Package="0402 (1005 Metric)", Lens Color=Colorless, manufacturer="QT Brightek (QTB)", Millicandela Rating=60mcd, Supplier Device Package=0402, Supplier Part Number 1=1516-QBLP595-2IBCT-ND, Voltage - Forward (Vf) (Typ)=3.2V, Color=Blue, componentlink1description=Datasheet, componentlink1url=https://www.qt-brightek.com/datasheet/QBLP595-2IB.pdf, componentlink2description="DigiKey Link", componentlink2url=https://www.digikey.com/en/products/detail/qt-brightek-qtb/QBLP595-2IB/22106662, Configuration=Standard, Height (Max)=0.60mm, lastupdated="4/5/2026 9:26:28 PM", Lens Size="0.70mm x 0.50mm", Lens Style="Rectangle with Flat Top", Lens Transparency=Clear, Lifecycle Status=Active, Minimum Order=1, Mounting Type="Surface Mount", Package / Case="0402 (1005 Metric)", packaging=TapeAndReel, Part Number=QBLP595-2IB, partid=1426, price=0.07, series=QBLP595, Size / Dimension="1.00mm L x 0.50mm W", Supplier 1=DigiKey, Viewing Angle=140°, Wavelength - Dominant=465nm, Wavelength - Peak=460nm
D203: library part QBLP595-R, "LED RED CLEAR 0402 SMD", Current - Test=20mA, Device Package="0402 (1005 Metric)", Lens Color=Colorless, manufacturer="QT Brightek (QTB)", Millicandela Rating=120mcd, Supplier Device Package=0402, Supplier Part Number 1=1516-1217-1-ND, Voltage - Forward (Vf) (Typ)=2V, Color=Red, componentlink1description=Datasheet, componentlink1url="http://www.qt-brightek.com/datasheet/QBLP595 Series.pdf", componentlink2description="DigiKey Link", componentlink2url=https://www.digikey.com/en/products/detail/qt-brightek-qtb/QBLP595-R/6201908, Configuration=Standard, Height (Max)=0.60mm, lastupdated="4/5/2026 9:26:30 PM", Lens Size="0.70mm x 0.50mm", Lens Style="Rectangle with Flat Top", Lens Transparency=Clear, Lifecycle Status=Active, Minimum Order=1, Mounting Type="Surface Mount", Package / Case="0402 (1005 Metric)", packaging=TapeAndReel, Part Number=QBLP595-R, Part Status=Active, partid=513, price=0.06, series=QBLP595, Size / Dimension="1.00mm L x 0.50mm W", Supplier 1=DigiKey, Viewing Angle=140°, Wavelength - Dominant=620nm, Wavelength - Peak=628nm
IC300: "Integrated Circuit", Manufacturer_Name=STMicroelectronics, Arrow Part Number=STM32C552RET6, Arrow Price/Stock=https://www.arrow.com/en/products/stm32c552ret6/stmicroelectronics.html?utm_currency=USD&region=nac, Datasheet Link=https://www.st.com/resource/en/datasheet/stm32c551cc.pdf, Height=1.6mm, Manufacturer_Part_Number=STM32C552RET6
IC400: "Integrated Circuit", Manufacturer_Name="Analog Devices", Mouser Part Number=700-MAX9850ETI+T, Arrow Part Number=MAX9850ETI+T, Arrow Price/Stock=https://www.arrow.com/en/products/max9850etit/analog-devices.html?utm_currency=USD&region=nac, Datasheet Link=https://datasheets.maximintegrated.com/en/ds/MAX9850.pdf, Height=0.8mm, Manufacturer_Part_Number=MAX9850ETI+T, Mouser Price/Stock=https://www.mouser.co.uk/ProductDetail/Analog-Devices-Maxim-Integrated/MAX9850ETI%2bT?qs=1eQvB6Dk1vhHg1cdsAgrFg%3D%3D
J201: library part CMP-17439-000368-1, "CONN HEADER SMD R/A 2POS 1MM", Color=Natural, Contact Resistance=40mR, Current Rating=700mA, Flammability Rating="UL94 V-0", Housing Color=Beige, Insulation Resistance=100MR, Max Current Rating=1A, Max Operating Temperature=85°C, Max Voltage Rating (AC)=50V, Min Operating Temperature=-25°C, Connector Type=Header, Contact Finish - Mating=TIN, Contact Material="Copper Alloy", Contact Plating=Tin, Contact Shape=Square, Contact Type="Male Pin", Depth=4.95mm, Fastening Type=Pull, Housing Material=Polyamide, Insulation Color=Natural, Insulation Material=Nylon, Lead Free="Lead Free", Lead Pitch=1mm, Length=4mm, Material=Polyamide, Mount="Surface Mount", Number of Contacts=2, Number of Positions=2, Number of Rows=1, Orientation="Right Angle", packaging="Tape and Reel", Pitch=1mm, REACH SVHC="No SVHC", series=SR, Termination=Solder, Voltage Rating=50V, Voltage Rating (AC)=50V
J400: "Connector", Manufacturer_Name="Same Sky", Mouser Part Number=490-SJ3524SMTTRBE, Arrow Part Number=SJ-3524-SMT-TR-BE, Arrow Price/Stock=https://www.arrow.com/en/products/sj-3524-smt-tr-be/cui-devices.html?utm_currency=USD&region=nac, Datasheet Link=https://www.sameskydevices.com/product/resource/sj-352x-smt.pdf, Height=5.37mm, Manufacturer_Part_Number=SJ-3524-SMT-TR-BE, Mouser Price/Stock=https://www.mouser.co.uk/ProductDetail/Same-Sky/SJ-3524-SMT-TR-BE?qs=WyjlAZoYn521xhWQ%2F0mK4A%3D%3D
J500: "FPC Connector 14 Pin 0.62mm Pitch", OLED Display Interfacing Document=https://www.buydisplay.com/download/interfacing/ER-OLED0.69-1_Interfacing.pdf, SSD1306B Datasheet=https://www.buydisplay.com/download/ic/SSD1306.pdf
J600: "Connector", Manufacturer_Name="GCT (GLOBAL CONNECTOR TECHNOLOGY)", Mouser Part Number=640-MEM20750014001A, Datasheet Link=http://www.farnell.com/cad/2606866.pdf, DigiKey Link=https://www.digikey.ca/en/products/detail/gct/MEM2075-00-140-01-A/9859614, Height=1.45mm, Manufacturer_Part_Number=MEM2075-00-140-01-A, Mouser Price/Stock=https://www.mouser.co.uk/ProductDetail/GCT/MEM2075-00-140-01-A?qs=KUoIvG%2F9IlZvfWpeERlq3Q%3D%3D
L200: library part CMP-06042-004536-1, "Wire Wound Ferrite Inductor for Power Lines 1.5μH ±20% 0.0588Ω 2510mA 1212", Case Code (Imperial)=1212, Case Code (Metric)=3030, Current Rating=1.1A, DC Resistance (DCR)=58.8mR, Inductance=1.5uH, Max Operating Temperature=105°C, Min Operating Temperature=-40°C, Part Number=LQH3NPN1R5MJRL, Resistor Type=Wirewound, Saturation Current=1.95A, Self Resonant Frequency=60MHz, Test Frequency=1MHz, Tolerance=20%, Case/Package=1212, Core Material=Ferrite, Height - Seated (Max)=0.047inch, Length=0.118inch, Mount="Surface Mount", packaging="Tape and Reel", Shielding=Shielded, Width=0.118inch
NT200 NT400: "Net Tie"
R200 R204 R207: library part AC0402JR-071K5L, "RES SMD 1.5K OHM 5% 1/16W 0402", Device Package="0402 (1005 Metric)", manufacturer=Yageo, Operating Temperature="-55°C ~ 155°C", Power (Watts)="0.063W, 1/16W", Ratings=AEC-Q200, Supplier Device Package=0402, Supplier Part Number 1=YAG3523CT-ND, Temperature Coefficient=±100ppm/°C, Tolerance=±5%, componentlink1description=Datasheet, componentlink1url=https://www.yageo.com/upload/media/product/productsearch/datasheet/rchip/PYu-AC_51_RoHS_L_7.pdf, componentlink2description="DigiKey Link", componentlink2url=https://www.digikey.com/en/products/detail/yageo/AC0402JR-071K5L/5895600, Composition="Thick Film", Features="Automotive AEC-Q200, Moisture Resistant", Height - Seated (Max)="0.015\" (0.37mm)", lastupdated="4/6/2026 7:41:17 PM", Lifecycle Status=Active, Minimum Order=1, Number of Terminations=2, Package / Case="0402 (1005 Metric)", packaging=CutTape, Part Number=AC0402JR-071K5L, Part Status=Active, partid=3395, price=0.10, Resistance="1.5 kOhms", series=AC, Size / Dimension="0.039\" L x 0.020\" W (1.00mm x 0.50mm)", Supplier 1=DigiKey
R201 R202: library part RT0402BRE075K1L, "RES SMD 5.1K OHM 0.1% 1/16W 0402", Device Package="0402 (1005 Metric)", manufacturer=Yageo, Operating Temperature="-55°C ~ 155°C", Power (Watts)="0.063W, 1/16W", Supplier Device Package=0402, Supplier Part Number 1=YAG4404CT-ND, Temperature Coefficient=±50ppm/°C, Tolerance=±0.1%, componentlink1description=Datasheet, componentlink1url=https://www.yageo.com/upload/media/product/productsearch/datasheet/rchip/PYu-RT_1-to-0.01_RoHS_L_11.pdf, componentlink2description="DigiKey Link", componentlink2url=https://www.digikey.com/en/products/detail/yageo/RT0402BRE075K1L/1069792, Composition="Thin Film", Height - Seated (Max)="0.014\" (0.35mm)", lastupdated="4/6/2026 7:41:16 PM", Lifecycle Status=Active, Minimum Order=1, Number of Terminations=2, Package / Case="0402 (1005 Metric)", packaging=TapeAndReel, Part Number=RT0402BRE075K1L, Part Status=Active, partid=4590, price=0.04, Resistance="5.1 kOhms", series=RT, Size / Dimension="0.039\" L x 0.020\" W (1.00mm x 0.50mm)", Supplier 1=DigiKey
R203: library part AC0402FR-071K54L, "RES SMD 1.54K OHM 1% 1/16W 0402", Device Package="0402 (1005 Metric)", manufacturer=Yageo, Operating Temperature="-55°C ~ 155°C", Power (Watts)="0.063W, 1/16W", Ratings=AEC-Q200, Supplier Device Package=0402, Supplier Part Number 1=YAG5645CT-ND, Temperature Coefficient=±100ppm/°C, Tolerance=±1%, componentlink1description=Datasheet, componentlink1url=https://www.yageo.com/upload/media/product/productsearch/datasheet/rchip/PYu-AC_51_RoHS_L_7.pdf, componentlink2description="DigiKey Link", componentlink2url=https://www.digikey.com/en/products/detail/yageo/AC0402FR-071K54L/5895142, Composition="Thick Film", Features="Automotive AEC-Q200, Moisture Resistant", Height - Seated (Max)="0.015\" (0.37mm)", lastupdated="4/6/2026 7:41:14 PM", Lifecycle Status=Active, Minimum Order=1, Number of Terminations=2, Package / Case="0402 (1005 Metric)", packaging=CutTape, Part Number=AC0402FR-071K54L, Part Status=Active, partid=5260, price=0.01, Resistance="1.54 kOhms", series=AC, Size / Dimension="0.039\" L x 0.020\" W (1.00mm x 0.50mm)", Supplier 1=DigiKey
R205: library part RC0402FR-072KL, "RES 2K OHM 1% 1/16W 0402", Device Package="0402 (1005 Metric)", manufacturer=Yageo, Operating Temperature="-55°C ~ 155°C", Power (Watts)="0.063W, 1/16W", Supplier Device Package=0402, Supplier Part Number 1=311-2KLRCT-ND, Temperature Coefficient=±100ppm/°C, Tolerance=±1%, componentlink1description=Datasheet, componentlink1url=https://www.yageo.com/upload/media/product/productsearch/datasheet/rchip/PYu-RC_Group_51_RoHS_L_10.pdf, componentlink2description="DigiKey Link", componentlink2url=https://www.digikey.com/en/products/detail/yageo/RC0402FR-072KL/2827565, Composition="Thick Film", Features="Moisture Resistant", Height - Seated (Max)="0.016\" (0.40mm)", lastupdated="4/6/2026 7:41:07 PM", Lifecycle Status=Active, Minimum Order=1, Number of Terminations=2, Package / Case="0402 (1005 Metric)", packaging=CutTape, Part Number=RC0402FR-072KL, Part Status=Active, partid=17610, price=0.01, Resistance="2 kOhms", series=RC_L, Size / Dimension="0.039\" L x 0.020\" W (1.00mm x 0.50mm)", Supplier 1=DigiKey
R206 R300 R301 R302 R303 R306 R307 R308 R309 R310 R400 R401 R402 R500 R501 R600 R601 R602: library part CRCW040210K0FKEE, "RES SMD 10K OHM 1% 1/16W 0402", Device Package="0402 (1005 Metric)", manufacturer="Vishay Dale", Operating Temperature="-55°C ~ 155°C", Power (Watts)="0.063W, 1/16W", Ratings=AEC-Q200, Supplier Device Package=0402, Supplier Part Number 1=541-2954-1-ND, Temperature Coefficient=±100ppm/°C, Tolerance=±1%, componentlink1description=Datasheet, componentlink1url=http://www.vishay.com/docs/20035/dcrcwe3.pdf, componentlink2description="DigiKey Link", componentlink2url=https://www.digikey.com/en/products/detail/vishay-dale/CRCW040210K0FKEE/5069897, Composition="Thick Film", Features="Automotive AEC-Q200", Height - Seated (Max)="0.016\" (0.40mm)", lastupdated="2/9/2024 8:30:20 PM", Lifecycle Status=Active, Minimum Order=1, Number of Terminations=2, Package / Case="0402 (1005 Metric)", packaging=CutTape, Part Number=CRCW040210K0FKEE, Part Status=Active, partid=3471, price=0.01, Resistance="10 kOhms", series=CRCW, Size / Dimension="0.039\" L x 0.020\" W (1.00mm x 0.50mm)", Supplier 1=DigiKey
R208: library part AC0402JR-07100RL, "RES SMD 100 OHM 5% 1/16W 0402", Device Package="0402 (1005 Metric)", manufacturer=Yageo, Operating Temperature="-55°C ~ 155°C", Power (Watts)="0.063W, 1/16W", Ratings=AEC-Q200, Supplier Device Package=0402, Supplier Part Number 1=YAG3516CT-ND, Temperature Coefficient=±100ppm/°C, Tolerance=±5%, componentlink1description=Datasheet, componentlink1url=https://www.yageo.com/upload/media/product/productsearch/datasheet/rchip/PYu-AC_51_RoHS_L_7.pdf, componentlink2description="DigiKey Link", componentlink2url=https://www.digikey.com/en/products/detail/yageo/AC0402JR-07100RL/5895570, Composition="Thick Film", Features="Automotive AEC-Q200, Moisture Resistant", Height - Seated (Max)="0.015\" (0.37mm)", lastupdated="4/6/2026 7:41:17 PM", Lifecycle Status=Active, Minimum Order=1, Number of Terminations=2, Package / Case="0402 (1005 Metric)", packaging=CutTape, Part Number=AC0402JR-07100RL, Part Status=Active, partid=3383, price=0.01, Resistance="100 Ohms", series=AC, Size / Dimension="0.039\" L x 0.020\" W (1.00mm x 0.50mm)", Supplier 1=DigiKey
R209: library part RMCF0402FT1M00, "RES 1M OHM 1% 1/16W 0402", Device Package="0402 (1005 Metric)", manufacturer="Stackpole Electronics Inc", Operating Temperature="-55°C ~ 155°C", Power (Watts)="0.063W, 1/16W", Ratings=AEC-Q200, Supplier Device Package=0402, Supplier Part Number 1=RMCF0402FT1M00CT-ND, Temperature Coefficient=±100ppm/°C, Tolerance=±1%, componentlink1description=Datasheet, componentlink1url=https://www.seielect.com/catalog/sei-rmcf_rmcp.pdf, componentlink2description="DigiKey Link", componentlink2url=https://www.digikey.com/en/products/detail/stackpole-electronics-inc/RMCF0402FT1M00/1761748, Composition="Thick Film", Features="Automotive AEC-Q200", Height - Seated (Max)="0.016\" (0.40mm)", lastupdated="09/02/2024 20:30:13", Lifecycle Status=Active, Minimum Order=1, Number of Terminations=2, Package / Case="0402 (1005 Metric)", packaging=CutTape, Part Number=RMCF0402FT1M00, Part Status=Active, partid=4912, price=0.01, Resistance="1 MOhms", series=RMCF, Size / Dimension="0.039\" L x 0.020\" W (1.00mm x 0.50mm)", Supplier 1=DigiKey
R210: library part RMCF0402FT178K, "RES 178K OHM 1% 1/16W 0402", Device Package="0402 (1005 Metric)", manufacturer="Stackpole Electronics Inc", Operating Temperature="-55°C ~ 155°C", Power (Watts)="0.063W, 1/16W", Ratings=AEC-Q200, Supplier Device Package=0402, Supplier Part Number 1=RMCF0402FT178KCT-ND, Temperature Coefficient=±100ppm/°C, Tolerance=±1%, componentlink1description=Datasheet, componentlink1url=https://www.seielect.com/catalog/sei-rmcf_rmcp.pdf, componentlink2description="DigiKey Link", componentlink2url=https://www.digikey.com/en/products/detail/stackpole-electronics-inc/RMCF0402FT178K/1714476, Composition="Thick Film", Features="Automotive AEC-Q200", Height - Seated (Max)="0.016\" (0.40mm)", lastupdated="09/02/2024 20:29:45", Lifecycle Status=Active, Minimum Order=1, Number of Terminations=2, Package / Case="0402 (1005 Metric)", packaging=CutTape, Part Number=RMCF0402FT178K, Part Status=Active, partid=13591, price=0.01, Resistance="178 kOhms", series=RMCF, Size / Dimension="0.039\" L x 0.020\" W (1.00mm x 0.50mm)", Supplier 1=DigiKey
R304 R305 R603: library part RT0402FRE07100KL, "RES SMD 100K OHM 1% 1/16W 0402", Device Package="0402 (1005 Metric)", manufacturer=Yageo, Operating Temperature="-55°C ~ 155°C", Power (Watts)="0.063W, 1/16W", Supplier Device Package=0402, Supplier Part Number 1=YAG2307CT-ND, Temperature Coefficient=±50ppm/°C, Tolerance=±1%, componentlink1description=Datasheet, componentlink1url=https://www.yageo.com/upload/media/product/productsearch/datasheet/rchip/PYu-RT_1-to-0.01_RoHS_L_11.pdf, componentlink2description="DigiKey Link", componentlink2url=https://www.digikey.com/en/products/detail/yageo/RT0402FRE07100KL/1071698, Composition="Thin Film", Height - Seated (Max)="0.014\" (0.35mm)", lastupdated="4/6/2026 7:41:17 PM", Lifecycle Status=Active, Minimum Order=1, Number of Terminations=2, Package / Case="0402 (1005 Metric)", packaging=TapeAndReel, Part Number=RT0402FRE07100KL, Part Status=Active, partid=3190, price=0.01, Resistance="100 kOhms", series=RT, Size / Dimension="0.039\" L x 0.020\" W (1.00mm x 0.50mm)", Supplier 1=DigiKey
R502: library part CRGCQ0402F390K, "RES 390K OHM 1% 1/16W 0402", Device Package="0402 (1005 Metric)", manufacturer="TE Connectivity Passive Product", Operating Temperature="-55°C ~ 155°C", Power (Watts)="0.063W, 1/16W", Ratings=AEC-Q200, Supplier Device Package=0402, Supplier Part Number 1=A129658CT-ND, Temperature Coefficient=±100ppm/°C, Tolerance=±1%, componentlink1description=Datasheet, componentlink1url=https://www.te.com/commerce/DocumentDelivery/DDEController?Action=srchrtrv&DocNm=1773204-3&DocType=DS&DocLang=English, componentlink2description="DigiKey Link", componentlink2url=https://www.digikey.com/en/products/detail/te-connectivity-passive-product/CRGCQ0402F390K/8576260, Composition="Thick Film", Features="Automotive AEC-Q200, Moisture Resistant", Height - Seated (Max)="0.016\" (0.40mm)", lastupdated="2/9/2024 8:30:02 PM", Lifecycle Status=Active, Minimum Order=1, Number of Terminations=2, Package / Case="0402 (1005 Metric)", packaging=CutTape, Part Number=CRGCQ0402F390K, Part Status=Active, partid=8107, price=0.01, Resistance="390 kOhms", series=CRGCQ, Size / Dimension="0.039\" L x 0.020\" W (1.00mm x 0.50mm)", Supplier 1=DigiKey
S300 S301 S302 S303 S304 S305 S307: "Switch", Manufacturer_Name=Panasonic, Arrow Part Number=EVQP7L01P, Arrow Price/Stock=https://www.arrow.com/en/products/evqp7l01p/panasonic, Datasheet Link=https://industry.panasonic.com/ac/cdn/e/control/switch/light-touch/catalog/sw_lt_eng_3529s_side.pdf, Manufacturer_Part_Number=EVQP7L01P
S306 S308: "Switch", Manufacturer_Name="ALPS Electric", Mouser Part Number=688-SKSVCBE010, Datasheet Link=https://tech.alpsalpine.com/e/products/detail/SKSVCBE010/, DigiKey Link=https://www.digikey.ca/en/products/detail/alps-alpine/SKSVCBE010/26519632, Height=0.65mm, Manufacturer_Part_Number=SKSVCBE010, Mouser Price/Stock=https://www.mouser.co.uk/ProductDetail/Alps-Alpine/SKSVCBE010?qs=Jm2GQyTW%2Fbim%2FQWWFLRejw%3D%3D
U200: library part CMP-0321-00456-2, "800 mA, Single-Input, Single Cell Li-Ion Battery Charger with Auto Start. Vovp=6.6 V, 3.5 V, -40 to 85 degC, 10-pin SON (DSQ), Green (RoHS & no Sb/Br)", manufacturer="Texas Instruments", Over Voltage Protection=N, componentlink1description=Datasheet, componentlink1url=http://www.ti.com/general/docs/lit/getliterature.tsp?genericPartNumber=BQ24040&fileType=pdf, DatasheetVersion=SLUS941A, Eco-Plan="Green (RoHS & no Sb/Br)", Lead Acid=N, Li-Ion=N, Li-Polymer=N, Mounting Technology="Surface Mount", NiCd=N, NiMH=N, PackageDescription="10-Pin Plastic Small Outline No-Lead, 2 x 2 x 0.8 mm Body, 0.4 mm Pitch, Exposed Pad", PackageReference=DSQ0010A, PackageVersion="revB, Apr-2010", PartNumber=BQ24040DSQR, SubFamily="Battery Charge Management", Vin(Min)(V)=3.5
U201: "300mA ultra-low-noise low-IQ low-dropout (LDO) linear regulator with high PSRR 4-X2SON -40 to 125", Manufacturer_Name="Texas Instruments", Copyright="Copyright (C) 2025 Ultra Librarian. All rights reserved.", Manufacturer_Part_Number=TPS7A2030PDQNR, RefDes=RefDes, TYPE=TYPE